# Altium PCB mmicronode_nicenano.PcbDoc
Units mm, origin at the board's own origin, x right, y up, seen from the top; angles counter-clockwise.
Board outline 18.25 x 33.5 mm, 2 copper layers (Top Layer, Bottom Layer); 8 components, 14 nets, 52 pads, 50 vias.
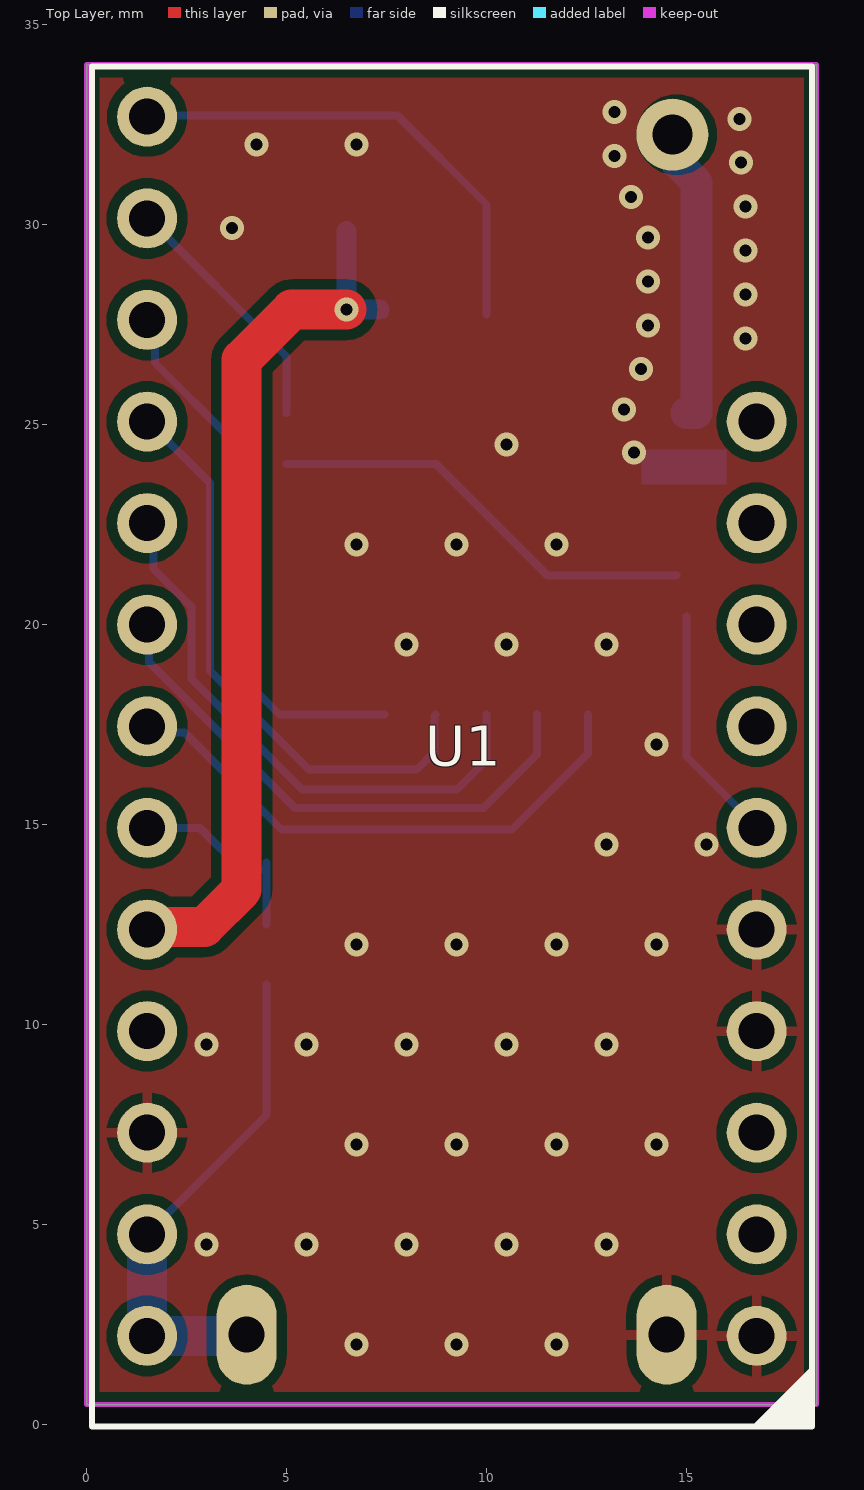
[diagram p0: Top Layer view]
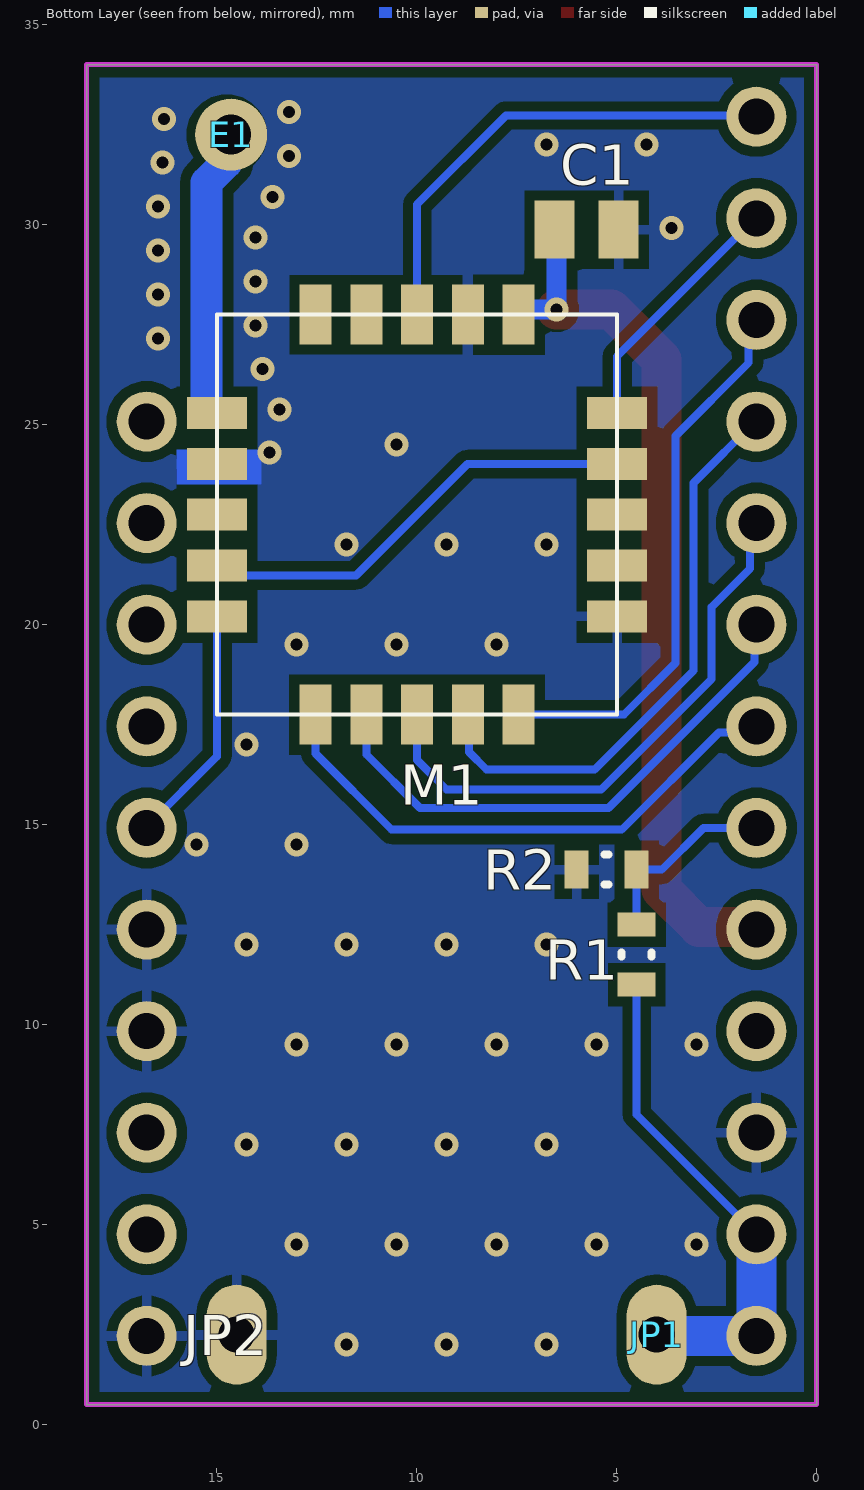
[diagram p1: Bottom Layer view, seen from below]

## Layer stack, top to bottom
Top Solder: solder mask 0.0102, Solder Resist, Dk 3.5
Top Layer: signal copper 0.0356
Dielectric 1: dielectric 0.32, FR-4, Dk 4.8
Bottom Layer: signal copper 0.0356
Bottom Solder: solder mask 0.0102, Solder Resist, Dk 3.5

## Board outline
0,0.5 0,34 18.25,34 18.25,0.5

## Design rules (kind name [scope] priority, off if disabled: settings)
Clearance [All] p1: gap=0.254 ignorepadtopadclearanceinfootprint=FALSE
MinimumSolderMaskSliver [All] p1: minsoldermaskwidth=0.05
PolygonConnect PolygonConnect_1 [All vs IsNamedPolygon('GND_L01_P001') Or IsNamedPolygon('GND_L02_P000')] p1: thpad.connectstyle=Relief thpad.reliefconductorwidth=0.254 thpad.reliefentries=4 thpad.polygonreliefangle="90 Angle" thpad.airgapwidth=0.254 smdpad.connectstyle=Relief smdpad.reliefconductorwidth=0.254 smdpad.reliefentries=4 smdpad.polygonreliefangle="90 Angle" smdpad.airgapwidth=0.254 via.connectstyle=Direct via.reliefconductorwidth=0.254 via.reliefentries=4 via.polygonreliefangle="90 Angle" via.airgapwidth=0.254
PolygonConnect [All] p2: connectstyle=Relief reliefconductorwidth=0.254 reliefentries=4 polygonreliefangle="90 Angle" airgapwidth=0.254
RoutingVias [All] p1: holewidth=0.711 width=1.27 viastyle="Through Hole" minholewidth=0.711 minwidth=1.27 maxholewidth=0.711 maxwidth=1.27
SilkToSilkClearance [All] p1: silktosilkclearance=0.1
SilkToSolderMaskClearance [IsPad] p1: minsilkscreentomaskgap=0.1 clearancetoexposedcopper=TRUE
SolderMaskExpansion [All] p1: expansion=0 istentingtop=FALSE
SupplyNets "Schematic Supply Nets_2" [InNet('GND')] p1: voltage=0.000
SupplyNets "Schematic Supply Nets_1" [InNet('+VBATT')] p2: voltage=0.000
SupplyNets "Schematic Supply Nets" [InNet('VCC')] p3: voltage=0.000
Width [All] p1: maxlimit=1 minlimit=0.15 preferedwidth=0.2
27 further rules are at their usual default settings.

## Components (designator, comment, footprint, x,y, rotation, side; value= is the part's Value field where it differs from the comment)
C1 "10uF" C-0805 5.75,29.875 r180 bottom
E1 "SPRING433" SPRING433 14.642,32.25 r180 bottom
JP1 "CON1" PAD1 4,2.25 r180 bottom
JP2 "CON1" PAD1 14.5,2.25 r180 bottom
M1 "E22-400MM22S" E290-XXXMM20S 7.45,27.75 r270 bottom locked
R1 "680k" R-0603 4.5,11.75 r270 bottom
R2 "1M" R-0603 5.25,13.875 r180 bottom
U1 "NICENANO_V2" NICENANO_CUTTED 9.13,17.46 r180 top locked

## Footprints (in the part's own frame and the unit in brackets; to place one, negate y for a bottom-side part, rotate by r counter-clockwise, add the part's x,y. Pads: shape width x height; smd on the part's side, far side on the other; paste and mask are expansions set on the pad)
C-0805 [mm] "Chip Capacitor, 2-Leads, Body 2,00x1,25mm, IPC Medium Density"
  rect 1x1.45 smd: 1(-0.8,0) 2(0.8,0)
  body extent -1,-0.63 1,0.63, height 1.25
E290-XXXMM20S [mm]
  rect 1.5x0.8 smd mask+0.102: 1(0,0) 2(0,-1.27) 3(0,-2.54) 4(0,-3.81) 5(0,-5.08) 11(10,-5.08) 12(10,-3.81) 13(10,-2.54) 14(10,-1.27) 15(10,0)
  rect 0.8x1.5 smd mask+0.102: 6(2.46,-7.54) 7(3.73,-7.54) 8(5,-7.54) 9(6.27,-7.54) 10(7.54,-7.54) 16(7.54,2.46) 17(6.27,2.46) 18(5,2.46) 19(3.73,2.46) 20(2.46,2.46)
  silkscreen extent 0,-7.54 10,2.46, body extent 0.08,-7.54 10.08,2.46, height 2.55
NICENANO_CUTTED [mm]
  round 1.5 hole 0.9: 1(-7.62,15.24) 2(-7.62,12.7) 3(-7.62,10.16) 4(-7.62,7.62) 5(-7.62,5.08) 6(-7.62,2.54) 7(-7.62,0) 8(-7.62,-2.54) 9(-7.62,-5.08) 10(-7.62,-7.62) 14(7.62,-15.24) 15(7.62,-12.7) 16(7.62,-10.16) 17(7.62,-7.62) 18(7.62,-5.08) 19(7.62,-2.54) 20(7.62,0) 21(7.62,2.54) 22(7.62,5.08) 23(7.62,7.62) 24(7.62,10.16) 25(7.62,12.7) 26(7.62,15.24)
  silkscreen extent -9,-16.5 9,17.5, body extent -8.9,-16.6 8.9,17.56, height 3
PAD1 [mm]
  oval 1.5x2.5 hole 0.9: 1(0,0)
R-0603 [mm] "Chip Resistor, 2-Leads, Body 1,60x0,82mm, IPC Medium Density"
  rect 0.6x0.95 smd: 1(-0.75,0) 2(0.75,0)
  silkscreen extent -0.05,-0.38 0.05,0.38, body extent -0.8,-0.4 0.8,0.4, height 0.45
SPRING433 [mm]
  round 1.8 hole 1: 1(0,0)
  body extent -3.6,-0.4 3.52,51.8, height 6.52

## Part data
C1: library part CAPN, Voltage=50V, Вид=Конденсатор, Точність/група=NP0
E1: library part ANT, Вид=Антена, Примітки=Пряма
R1 R2: library part RES, Вид=Резистор, Точність/група=5%
JP1 JP2: Вид=Роз'єм
U1: Вид=Мікросхема

## Via types
v1: diameter 0.6, hole 0.3, Top Layer to Bottom Layer, tented both sides, 48 vias
v2: diameter 0.6, hole 0.3, Top Layer to Bottom Layer, 2 vias

## Nets (pads, with @x,y where several pads share a name; then routed paths per layer and width w, separated by ;. In a path a pad name is that pad's centre, name@x,y a point inside that pad or via, vN(x,y) a via of type N, cw(c..) or ccw(c..) an arc to the next point about the centre after c; other vN are vias at no path point)
+VBATT: JP1.1 R1.2 U1.25 U1.26 | length 12.5
  Bottom Layer w0.2: U1.25 4.5,7.75 R1.2 ; JP1.1@3.97,2.22 JP1.1
  Bottom Layer w1: U1.25 U1.26 JP1.1@3.97,2.22
AIN0_VBATT: R1.1 R2.2 U1.21 | length 5
  Bottom Layer w0.2: U1.21 2.83,14.92 3.875,13.875 R2.2 ; R1.1 R2.2 ; R2.2@4.5,14.05 R2.2
ANT_SW: M1.10 U1.6 | length 6
  Bottom Layer w0.2: M1.10 14.99,16.71 U1.6@16.75,14.95
BUSY: M1.11 U1.20 | length 13.8
  Bottom Layer w0.2: U1.20 1.662,17.308 2.442,17.308 4.875,14.875 10.625,14.875 12.53,16.78 M1.11
GND: C1.2 JP2.1 M1.2 M1.7 M1.16 R2.1 U1.1 U1.4 U1.5 U1.24
  other v1: 6.75,2 9.25,2 11.75,2 3,4.5 5.5,4.5 8,4.5 10.5,4.5 13,4.5 6.75,7 9.25,7 11.75,7 14.25,7 3,9.5 5.5,9.5 8,9.5 10.5,9.5 13,9.5 6.75,12 9.25,12 11.75,12 14.25,12 13,14.5 15.5,14.5 14.25,17 8,19.5 10.5,19.5 13,19.5 6.75,22 9.25,22 11.75,22 13.684,24.309 10.5,24.5 13.433,25.38 13.854,26.396 16.465,27.155 14.035,27.481 16.465,28.255 14.035,28.581 16.465,29.355 14.035,29.681 16.465,30.455 13.605,30.693 16.359,31.55 13.192,31.713 4.25,32 6.75,32 16.313,32.649 13.194,32.813
  other v2: 3.634,29.916
MISO: M1.12 U1.19 | length 13.7
  Bottom Layer w0.2: U1.19@1.51,20.03 1.558,19.982 1.558,19.067 5.204,15.421 9.921,15.421 11.26,16.76 M1.12
MOSI: M1.13 U1.18 | length 14.3
  Bottom Layer w0.2: U1.18@1.51,22.57 1.663,22.417 1.663,21.408 2.625,20.446 2.625,18.642 5.392,15.875 9.25,15.875 9.99,16.615 M1.13
NetE1_1: E1.1 M1.6 | length 7.4
  Bottom Layer w0.8: E1.1@14.75,32.25 14.75,31.561 15.25,31.061 15.25,25.29 M1.6
NetM1_9: M1.9 M1.19 | length 10.9
  Bottom Layer w0.2: M1.19 8.73,24.02 11.52,21.23 M1.9@14.75,21.23
NSS: M1.14 U1.17 | length 14.7
  Bottom Layer w0.2: U1.17@1.51,25.11 3.079,23.541 3.079,18.852 5.556,16.375 8.25,16.375 8.692,16.817 8.692,17.722 M1.14
RF_IRQ: M1.20 U1.15 | length 6.3
  Bottom Layer w0.2: U1.15@1.51,30.19 4.99,26.71 M1.20
RF_RST: M1.3 U1.14 | length 12.2
  Bottom Layer w0.2: U1.14@1.51,32.73 7.77,32.73 9.99,30.51 M1.3
SCK: M1.15 U1.16 | length 13.9
  Bottom Layer w0.2: U1.16@1.51,27.65 1.702,27.458 1.702,26.55 3.533,24.719 3.533,19.04 4.823,17.75 M1.15
VCC: C1.1 M1.1 U1.22 | length 22.1
  Top Layer w0.2: U1.22 U1.22@1.573,12.443
  Top Layer w1: U1.22@1.573,12.443 2.943,12.443 3.875,13.375 3.875,26.625 5.125,27.875 v2(6.5,27.875)
  Bottom Layer w0.2: M1.1@7.325,27.875 M1.1
  Bottom Layer w0.5: C1.1@6.5,29.845 v2(6.5,27.875) M1.1@7.325,27.875
pads on no net: M1.4 M1.5 M1.8 M1.17 M1.18 U1.2 U1.3 U1.7 U1.8 U1.9 U1.10 U1.23

## Polygon pours and split planes (outlines as drawn)
GND on Bottom Layer "GND_L02_P000" (solid, remove dead copper, pour order 0): 0,0 18.25,0 18.25,34 0,34
GND on Top Layer "GND_L01_P001" (solid, remove dead copper, pour order 1): 0,0 18.25,0 18.25,34 0,34

## Keep-outs
Keep-Out Layer:
  the board outline again, w0.125

## Other copper
Bottom Layer:
  rectangle net GND: 13.875,23.5 16,24.375